# Altium PCB LiFi_Connected_no_dr.PcbDoc
Units mil, origin at the board's own origin, x right, y up, seen from the top; angles counter-clockwise.
Board outline 3149.61 x 2362.2 mil, 4 copper layers (Top Layer, L2_GND, L3_POWER, Bottom Layer), stack 63.08 mil thick; 66 components, 34 nets, 188 pads, 84 vias.
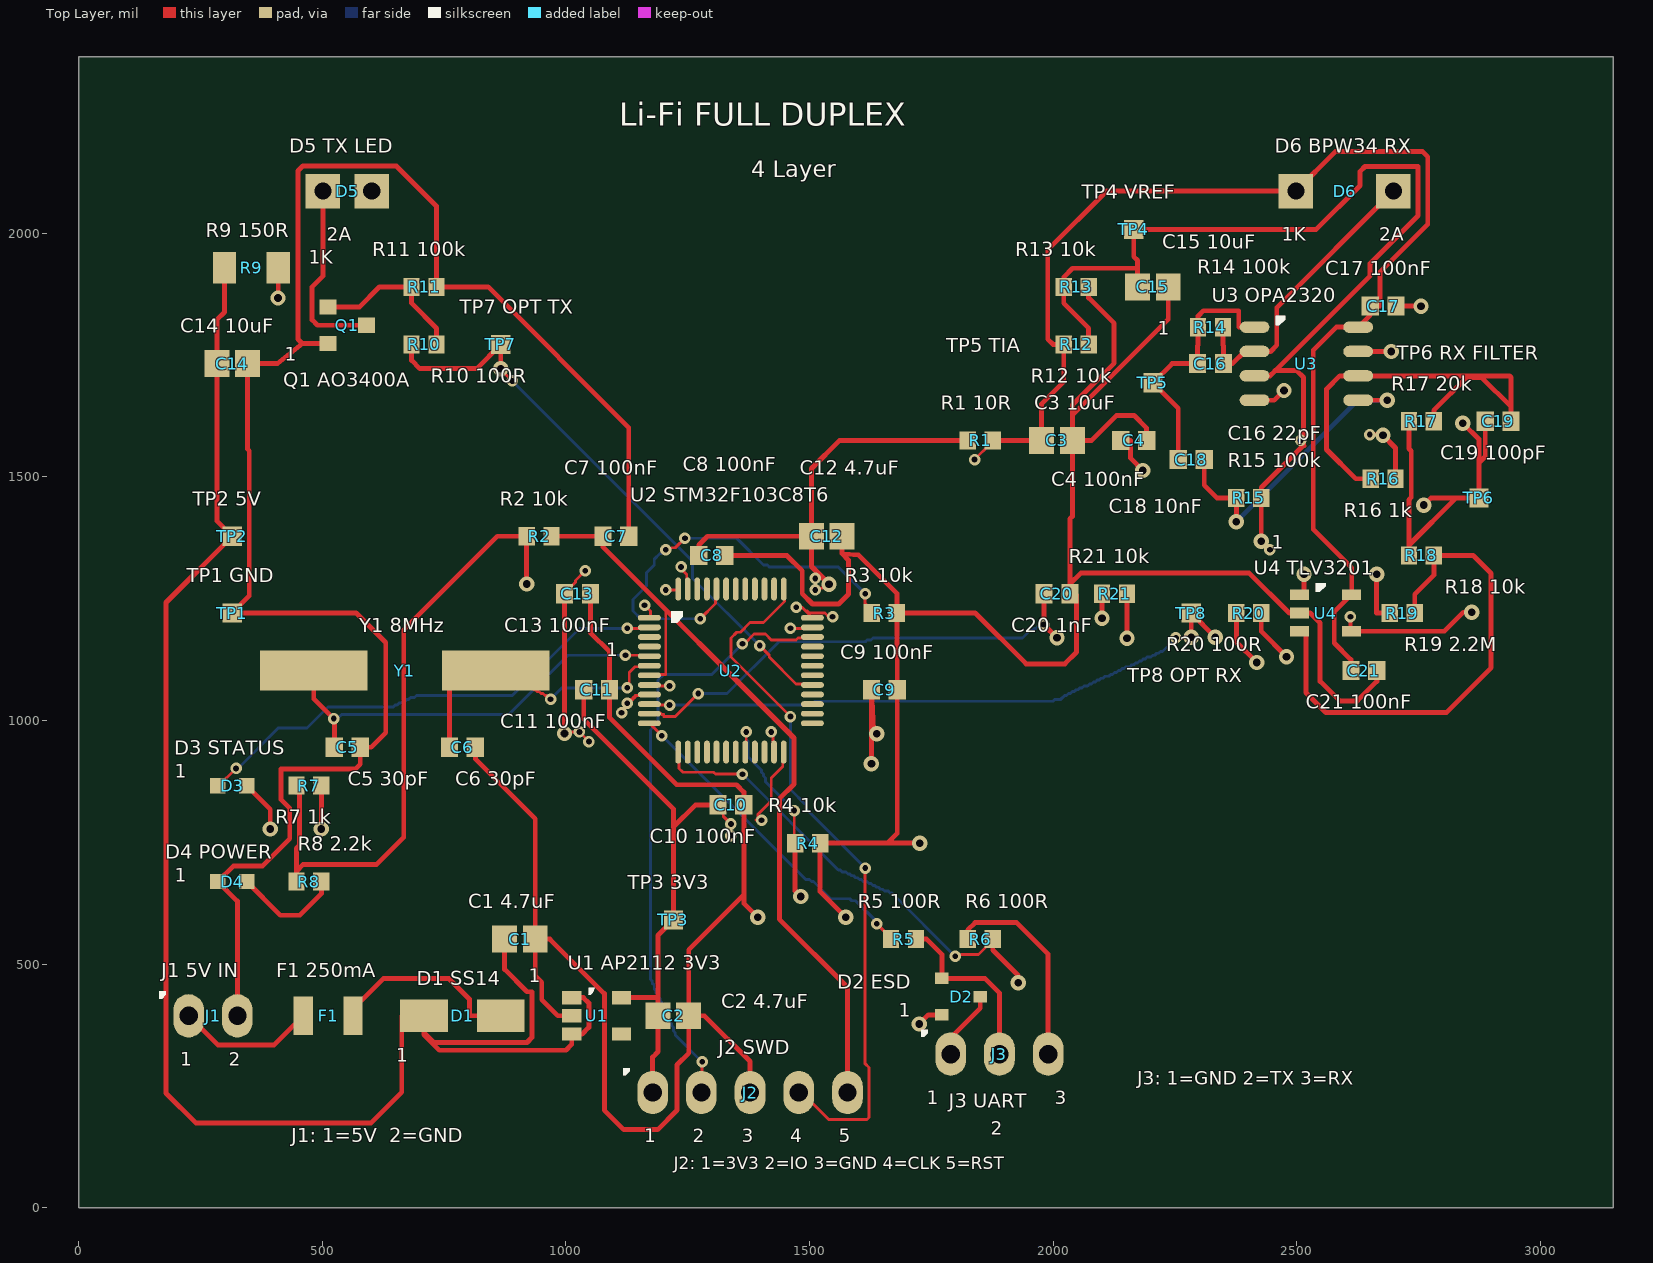
[diagram p0: Top Layer view]
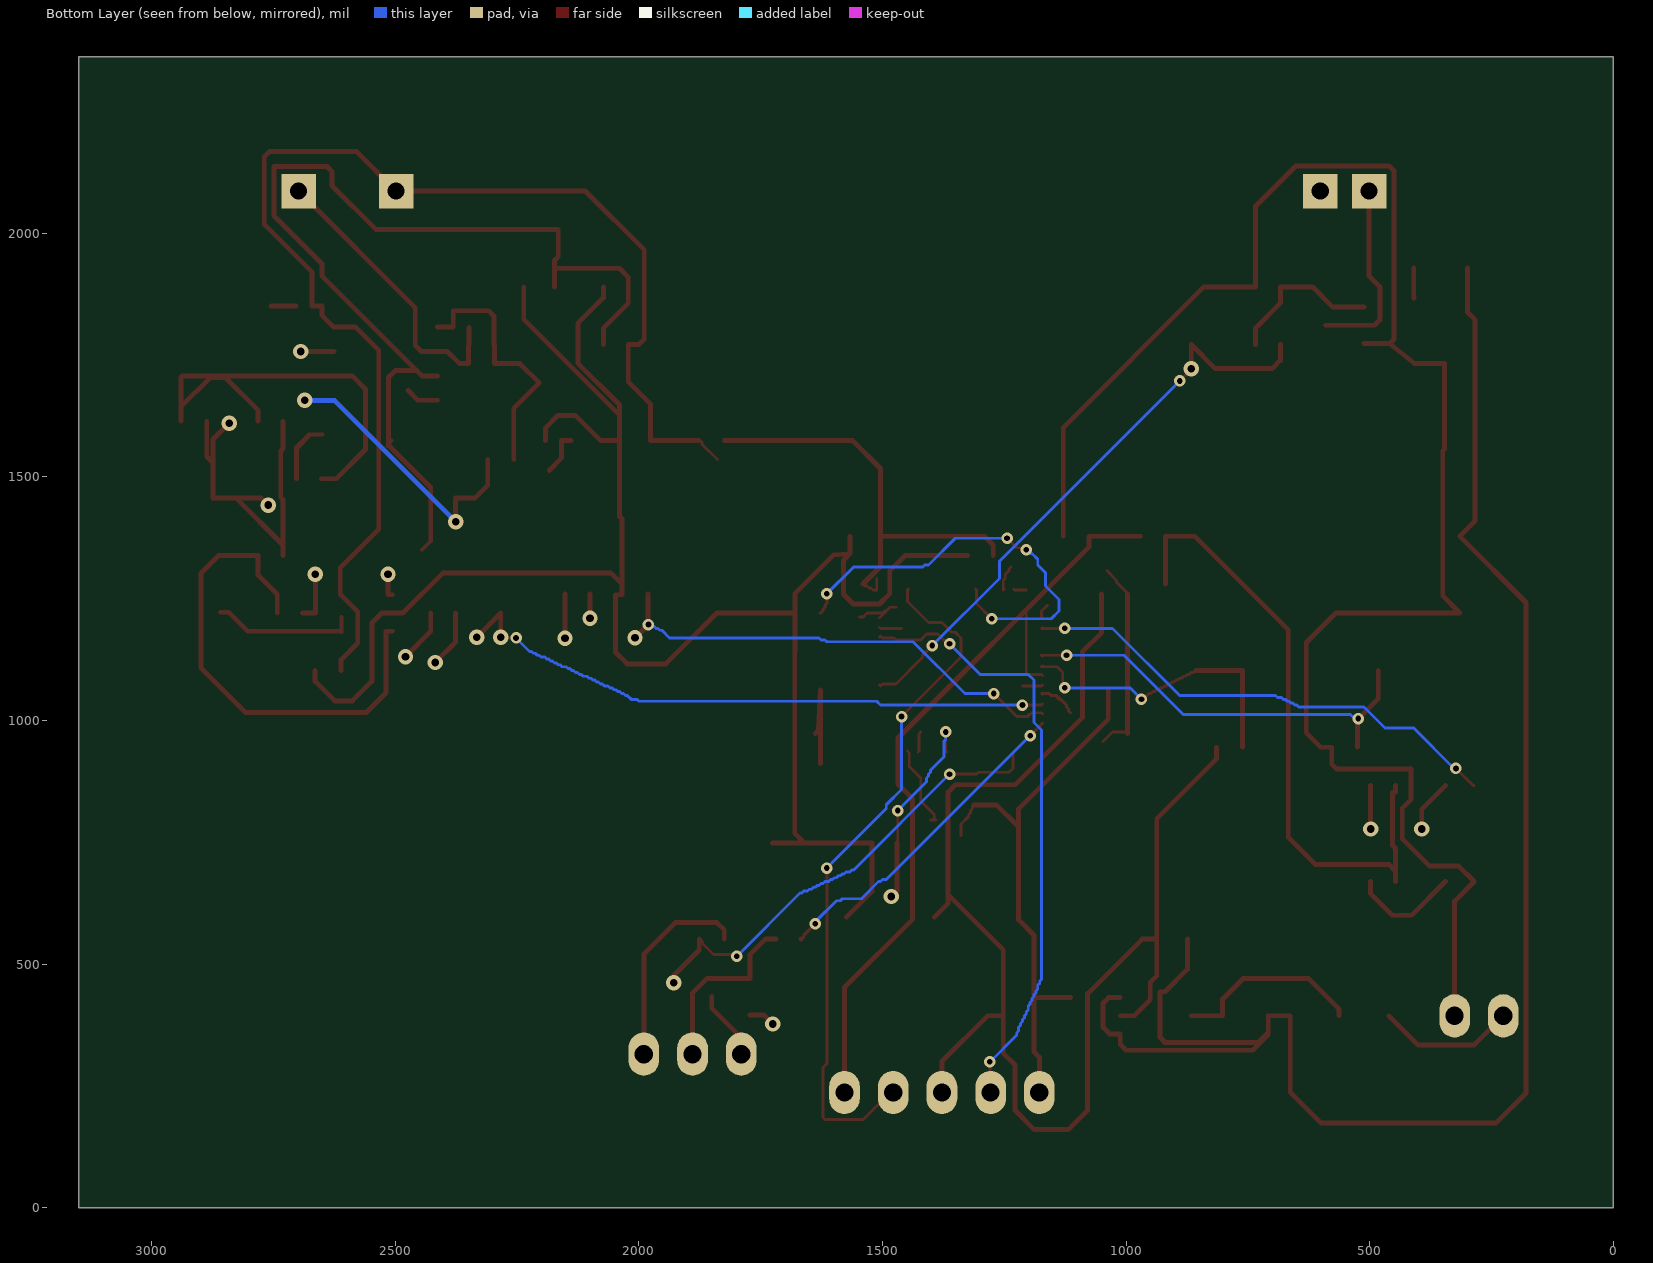
[diagram p1: Bottom Layer view, seen from below]
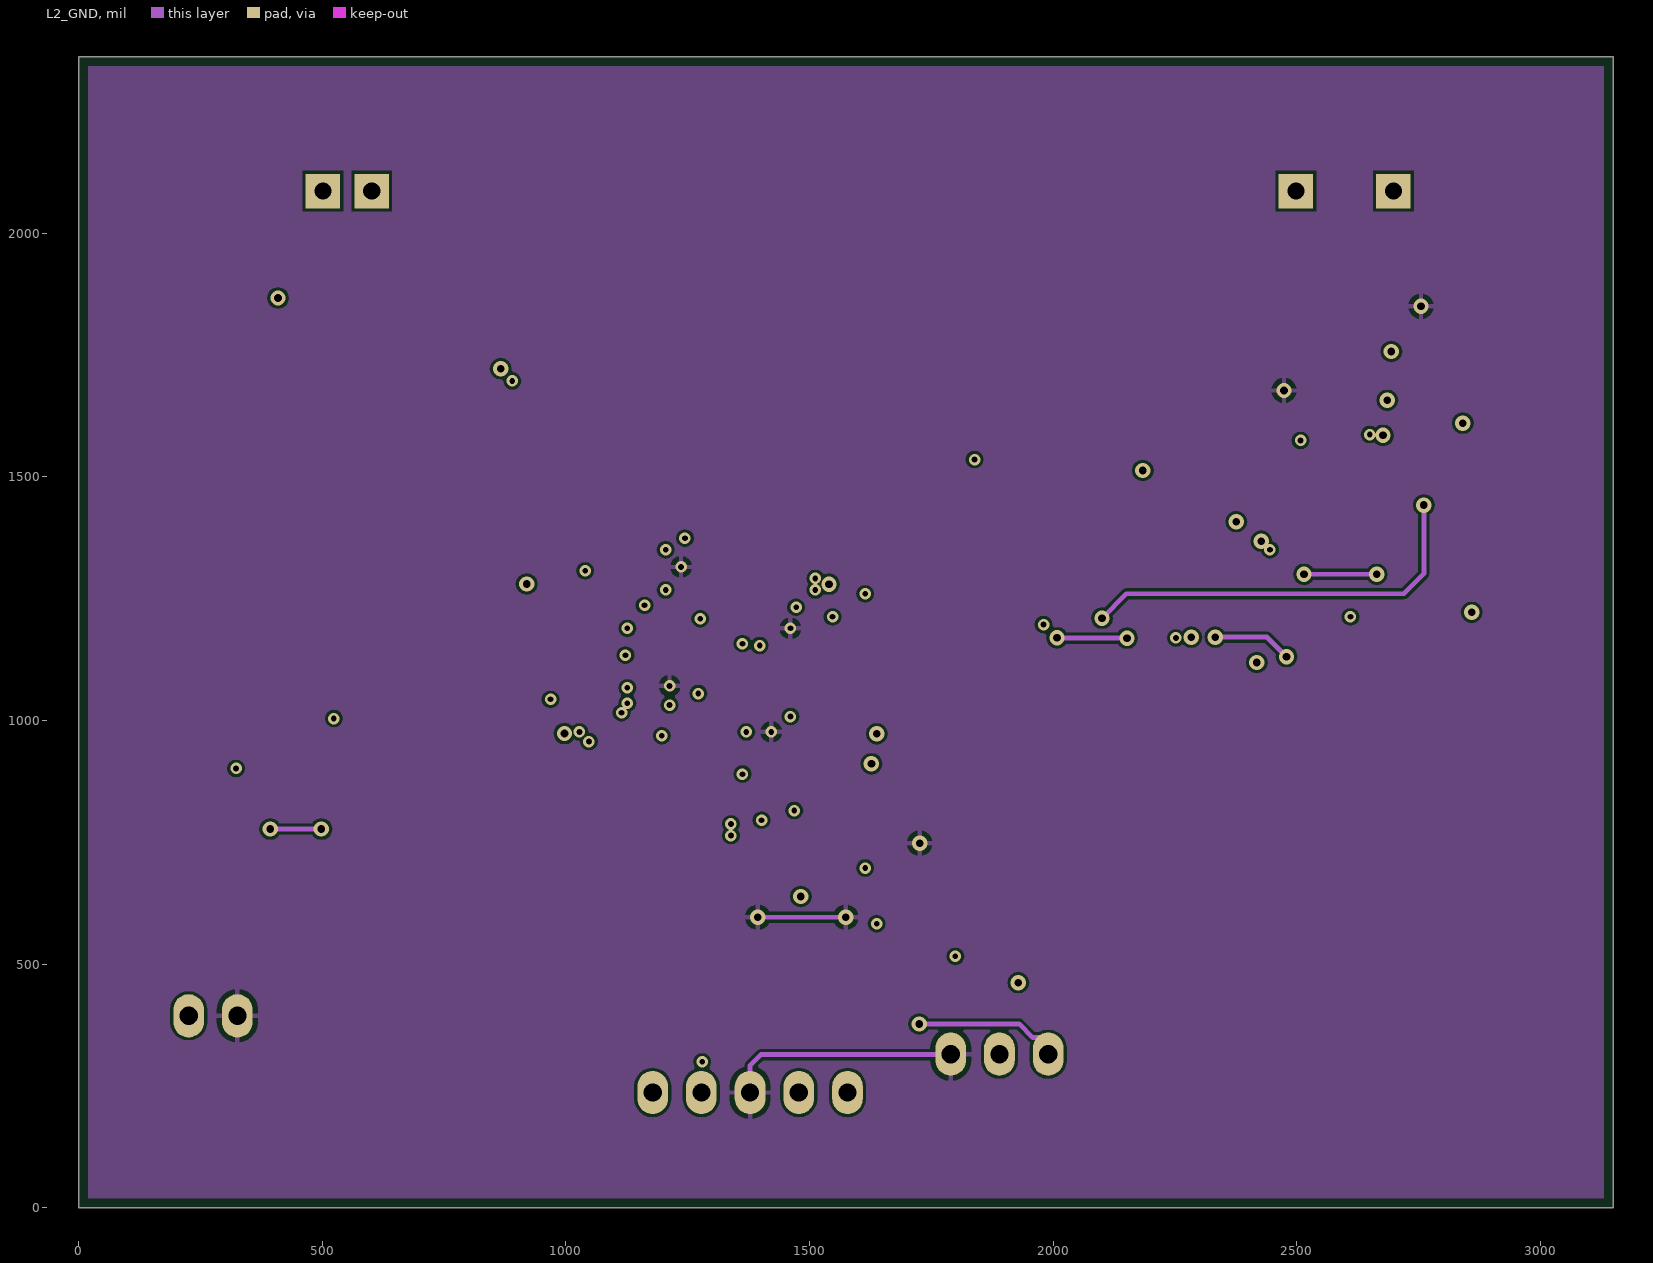
[diagram p2: L2_GND]
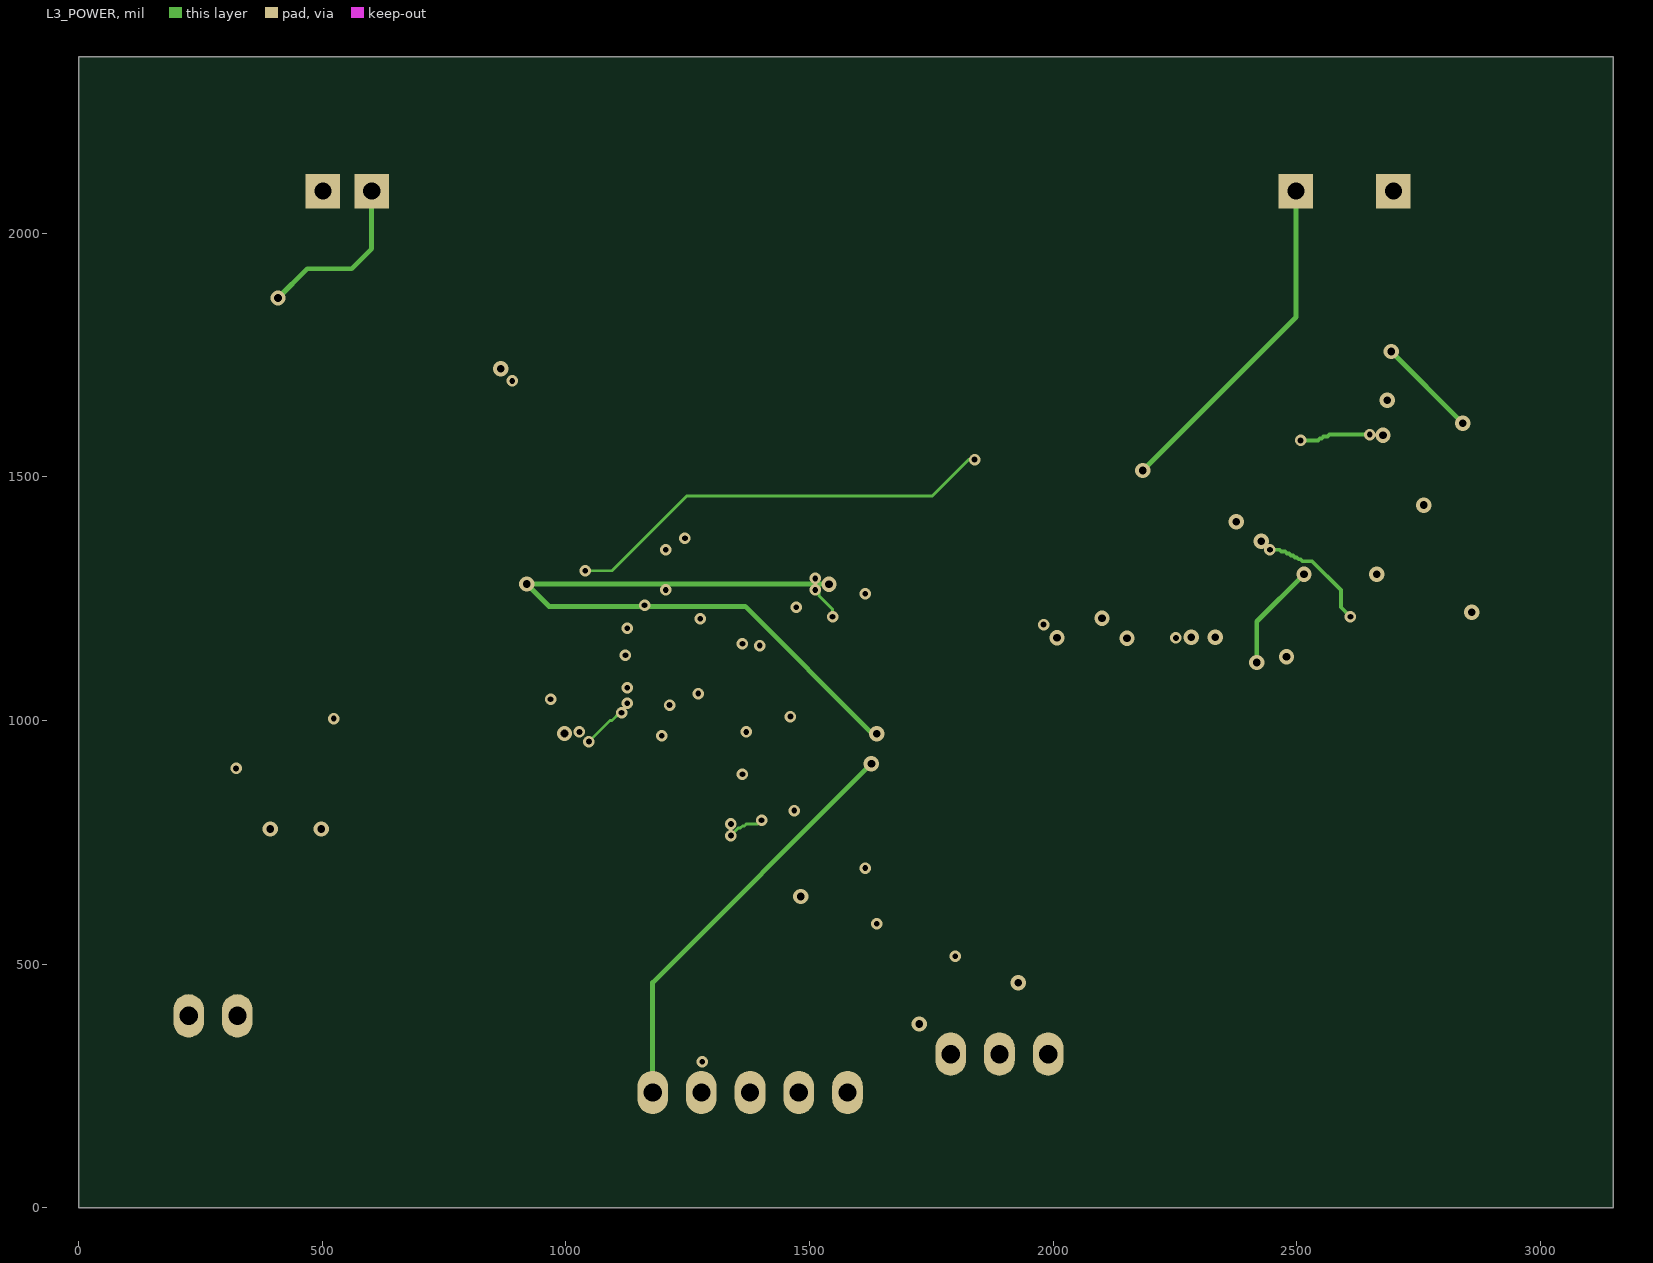
[diagram p3: L3_POWER]
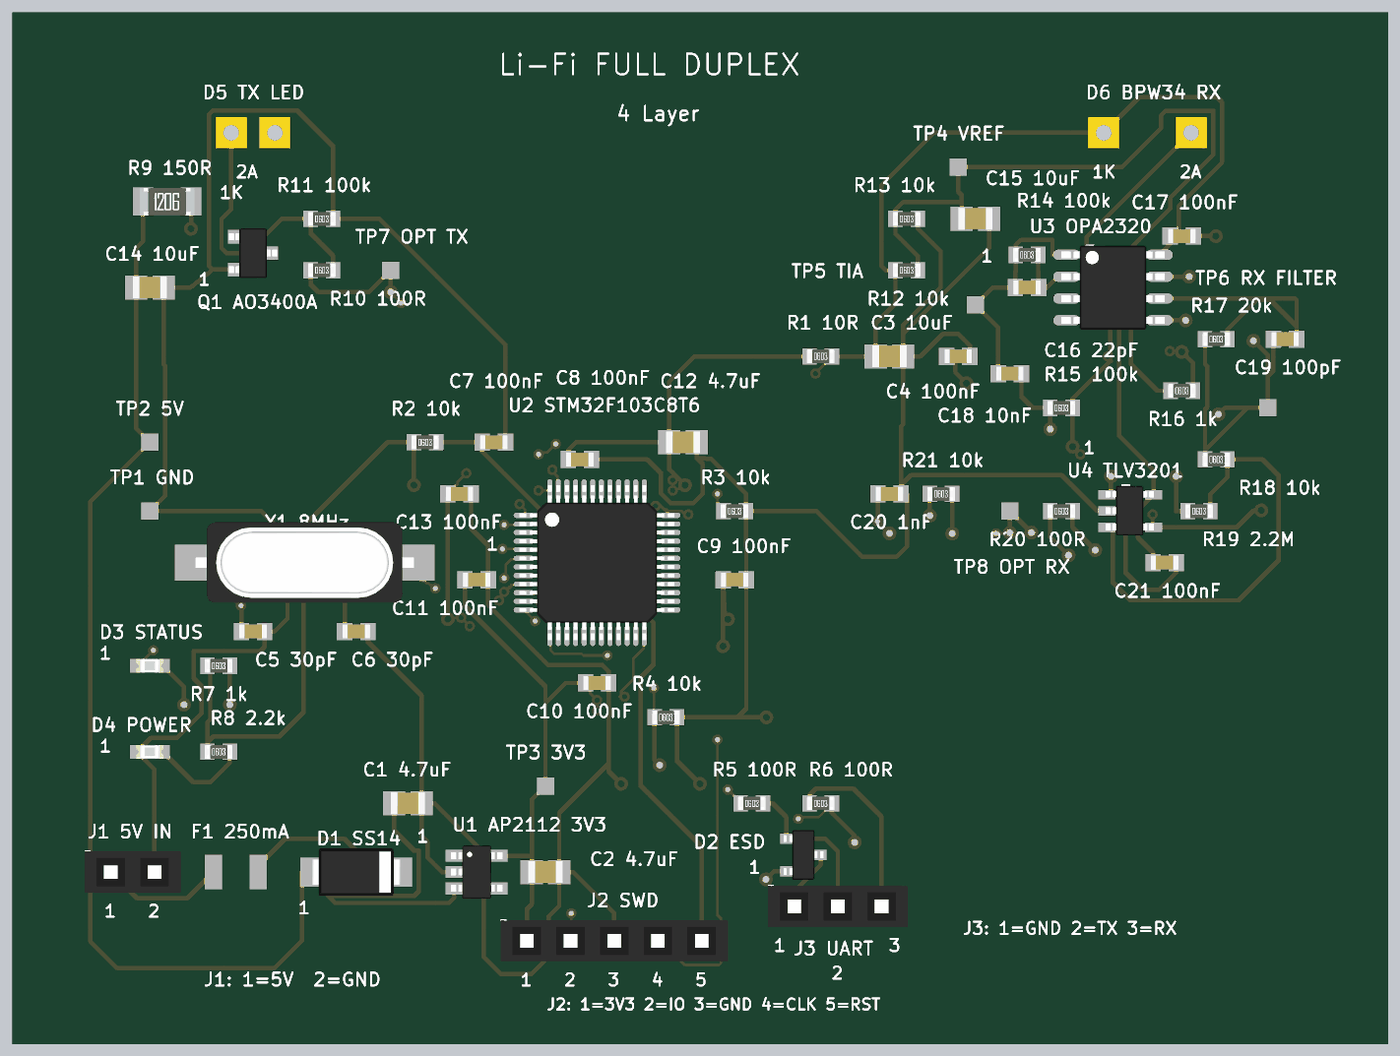
[diagram p4: 3D render of the assembled board from above, using the file's embedded part models]

## Layer stack, top to bottom
Top Solder: solder mask 0.4, Solder Resist, Dk 3.5
Top Layer: signal copper 1.4
Prepreg 1: dielectric 7.874, FR-4, Dk 4.8
L2_GND: signal copper 1.4
Core: dielectric 41.732, FR-4, Dk 4.8
L3_POWER: signal copper 1.4
Prepreg 2: dielectric 7.874, FR-4, Dk 4.8
Bottom Layer: signal copper 1.4
Bottom Solder: solder mask 0.4, Solder Resist, Dk 3.5

## Board outline
0,0 3149.61,0 3149.61,2362.2 0,2362.2

## Design rules (kind name [scope] priority, off if disabled: settings)
Clearance [All] p1: gap=5.91 ignorepadtopadclearanceinfootprint=FALSE
MinimumSolderMaskSliver [All] p1: minsoldermaskwidth=4
PolygonConnect [All] p1: connectstyle=Relief reliefconductorwidth=10 reliefentries=4 polygonreliefangle="90 Angle" airgapwidth=10
RoutingVias [All] p1: holewidth=28 width=50 viastyle="Through Hole" minholewidth=28 minwidth=50 maxholewidth=28 maxwidth=50
SolderMaskExpansion [All] p1: expansion=0.98 istentingtop=FALSE
SupplyNets "Schematic Supply Nets_4" [InNet('GND')] p1: voltage=0.000
SupplyNets "Schematic Supply Nets_3" [InNet('V3V3_A')] p2: voltage=0.000
SupplyNets "Schematic Supply Nets_2" [InNet('VREF')] p3: voltage=0.000
SupplyNets "Schematic Supply Nets_1" [InNet('V5_PROTECTED')] p4: voltage=0.000
SupplyNets "Schematic Supply Nets" [InNet('V3V3')] p5: voltage=0.000
Width [All] p1: maxlimit=78.74 minlimit=5.91 preferedwidth=10
29 further rules are at their usual default settings.

## Components (designator, comment, footprint, x,y, rotation, side; value= is the part's Value field where it differs from the comment)
C1 "4.7uF 10V X7R" "CAP 0805_2012" 905.51,551.18 r0 top
C2 "4.7uF 10V X7R" "CAP 0805_2012" 1220.47,393.7 r0 top
C3 "10uF 10V X7R" "CAP 0805_2012" 2007.87,1574.8 r0 top
C4 "100nF" "CAP 0603_1608" 2165.35,1574.8 r0 top
C5 "30pF C0G (tune)" "CAP 0603_1608" 551.18,944.88 r0 top
C6 "30pF C0G (tune)" "CAP 0603_1608" 787.4,944.88 r0 top
C7 "100nF" "CAP 0603_1608" 1102.36,1377.95 r0 top
C8 "100nF" "CAP 0603_1608" 1299.21,1338.58 r0 top
C9 "100nF" "CAP 0603_1608" 1653.54,1062.99 r0 top
C10 "100nF" "CAP 0603_1608" 1338.58,826.77 r0 top
C11 "100nF" "CAP 0603_1608" 1062.99,1062.99 r0 top
C12 "4.7uF" "CAP 0805_2012" 1535.43,1377.95 r0 top
C13 "100nF" "CAP 0603_1608" 1023.62,1259.84 r0 top
C14 "10uF 10V" "CAP 0805_2012" 314.96,1732.28 r0 top
C15 "10uF" "CAP 0805_2012" 2204.72,1889.76 r0 top
C16 "22pF C0G (tune)" "CAP 0603_1608" 2322.83,1732.28 r0 top
C17 "100nF" "CAP 0603_1608" 2677.17,1850.39 r0 top
C18 "10nF C0G" "CAP 0603_1608" 2283.46,1535.43 r0 top
C19 "100pF C0G" "CAP 0603_1608" 2913.39,1614.17 r0 top
C20 "1nF" "CAP 0603_1608" 2007.87,1259.84 r0 top
C21 "100nF" "CAP 0603_1608" 2637.8,1102.36 r0 top
D1 "SS14" "DO214AC SMA" 787.4,393.7 r0 top
D2 "PESD3V3S2BT" "NEXPERIA SOT-23-3" 1811.02,433.07 r0 top
D3 "GREEN status LED" "LED 0603_1608 GREEN" 314.96,866.14 r0 top
D4 "GREEN power LED" "LED 0603_1608 GREEN" 314.96,669.29 r0 top
D5 "WP7113SRD/D visible red" "KINGBRIGHT WP7113SRD" 551.18,2086.61 r0 top
D6 "BPW34 photodiode" "VISHAY BPW34" 2598.43,2086.61 r0 top
F1 "MF-NSMF025X-2 250mA" "BOURNS MF-NSMF025X" 511.81,393.7 r0 top
J1 "5V regulated input" "SAMTEC SSW-102-03-T-S" 275.59,393.7 r0 top
J2 "SWD 3.3V reference" "SAMTEC SSW-105-03-T-S" 1377.95,236.22 r0 top
J3 "UART 3.3V logic" "SAMTEC SSW-103-03-T-S" 1889.76,314.96 r0 top
Q1 "AO3400A" "DIODES SOT-23-3" 551.18,1811.02 r0 top
R1 "10R" "RES 0603_1608" 1850.39,1574.8 r0 top
R2 "10k" "RES 0603_1608" 944.88,1377.95 r0 top
R3 "10k" "RES 0603_1608" 1653.54,1220.47 r0 top
R4 "10k" "RES 0603_1608" 1496.06,748.03 r0 top
R5 "100R" "RES 0603_1608" 1692.91,551.18 r0 top
R6 "100R" "RES 0603_1608" 1850.39,551.18 r0 top
R7 "1k" "RES 0603_1608" 472.44,866.14 r0 top
R8 "2.2k" "RES 0603_1608" 472.44,669.29 r0 top
R9 "150R 0.25W" "RES 1206_3216" 354.33,1929.13 r0 top
R10 "100R" "RES 0603_1608" 708.66,1771.65 r0 top
R11 "100k" "RES 0603_1608" 708.66,1889.76 r0 top
R12 "10k 0.1%" "RES 0603_1608" 2047.24,1771.65 r0 top
R13 "10k 0.1%" "RES 0603_1608" 2047.24,1889.76 r0 top
R14 "100k 1%" "RES 0603_1608" 2322.83,1807.09 r0 top
R15 "100k" "RES 0603_1608" 2401.57,1456.69 r0 top
R16 "1k" "RES 0603_1608" 2677.17,1496.06 r0 top
R17 "20k" "RES 0603_1608" 2755.91,1614.17 r0 top
R18 "10k" "RES 0603_1608" 2755.91,1338.58 r0 top
R19 "2.2M" "RES 0603_1608" 2716.54,1220.47 r0 top
R20 "100R" "RES 0603_1608" 2401.57,1220.47 r0 top
R21 "10k" "RES 0603_1608" 2125.98,1259.84 r0 top
TP1 "GND" "TEST PAD 1MM" 314.96,1220.47 r0 top
TP2 "V5_PROTECTED" "TEST PAD 1MM" 314.96,1377.95 r0 top
TP3 "V3V3" "TEST PAD 1MM" 1220.47,590.55 r0 top
TP4 "VREF" "TEST PAD 1MM" 2165.35,2007.87 r0 top
TP5 "TIA_OUT" "TEST PAD 1MM" 2204.72,1692.91 r0 top
TP6 "RX_FILTER" "TEST PAD 1MM" 2874.02,1456.69 r0 top
TP7 "OPT_TX" "TEST PAD 1MM" 866.14,1771.65 r0 top
TP8 "OPT_RX" "TEST PAD 1MM" 2283.46,1220.47 r0 top
U1 "AP2112K-3.3TRG1" "DIODES SOT-23-5 K" 1062.99,393.7 r0 top
U2 "STM32F103C8T6" "ST LQFP-48 7x7MM" 1338.58,1102.36 r0 top
U3 "OPA2320AID" "TI SOIC-8 D" 2519.68,1732.28 r0 top
U4 "TLV3201AIDBVR" "TI SOT-23-5 DBV" 2559.06,1220.47 r0 top
Y1 "ABLS-8.000MHZ-B2-T" "ABRACON ABLS" 669.29,1102.36 r0 top

## Footprints (in the part's own frame and the unit in brackets; to place one, negate y for a bottom-side part, rotate by r counter-clockwise, add the part's x,y. Pads: shape width x height; smd on the part's side, far side on the other; paste and mask are expansions set on the pad)
"ABRACON ABLS" [mm] "Crystal, 2-Leads, Body 4.70x11.40mm, Pitch 8.80mm, IPC Medium Density"
  rect 5.6x2.1 smd: 1(-4.75,0) 2(4.75,0)
  body extent -6.35,-2.35 6.35,2.35, height 4.2
"BOURNS MF-NSMF025X" [mm]
  rect 1x2 smd: 1(-1.3,0) 2(1.3,0)
"CAP 0603_1608" [mm] "Chip Capacitor, 2-Leads, Body 1.60x0.80mm, IPC Medium Density"
  rect 0.9x1 smd: 1(-0.675,0) 2(0.675,0)
  body extent -0.8,-0.41 0.8,0.41, height 0.82
"CAP 0805_2012" [mm] "Chip Capacitor, 2-Leads, Body 2.00x1.20mm, IPC Medium Density"
  rect 1.3x1.4 smd: 1(-0.8,0) 2(0.8,0)
  body extent -1,-0.64 1,0.64, height 1.26
"DIODES SOT-23-3" [mm] "SOT23, 3-Leads, Body 2.90x2.40mm, Pitch 0.95mm, IPC Medium Density"
  rect 0.9x0.8 smd: 1(-1,0.95) 2(-1,-0.95) 3(1,0)
  body extent -1.41,-1.45 1.41,1.45, height 1.5
"DIODES SOT-23-5 K" [mm] "SOT23, 5-Leads, Body 3.00x2.85mm, Pitch 0.95mm, IPC Medium Density"
  rect 1x0.7 smd: 1(-1.3,0.95) 2(-1.3,0) 3(-1.3,-0.95) 4(1.3,-0.95) 5(1.3,0.95)
  silkscreen extent -0.45,1.1 -0.1,1.45, body extent -1.5,-1.55 1.5,1.55, height 1.45
"DO214AC SMA" [mm] "Molded Diode, 2-Leads, Body 4.30x2.60mm, IPC Medium Density"
  rect 2.5x1.7 smd: 1(-2,0) 2(2,0)
  body extent -2.6,-1.37 2.6,1.37, height 2.4
"KINGBRIGHT WP7113SRD" [mm]
  rect 1.8x1.8 hole 0.9: 1(-1.27,0) 2(1.27,0)
"LED 0603_1608 GREEN" [mm] "Chip Diode, 2-Leads, Body 1.60x0.80mm, IPC Medium Density"
  rect 0.8x0.8 smd: 1(-0.75,0) 2(0.75,0)
  body extent -0.8,-0.4 0.8,0.4, height 0.53
"NEXPERIA SOT-23-3" [mm] "SOT23, 3-Leads, Body 2.90x2.40mm, Pitch 0.95mm, IPC Medium Density"
  rect 0.7x0.6 smd: 1(-1,0.95) 2(-1,-0.95) 3(1,0)
  body extent -1.16,-1.45 1.16,1.45, height 1.5
"RES 0603_1608" [mm] "Chip Resistor, 2-Leads, Body 1.60x0.80mm, IPC Medium Density"
  rect 0.85x0.95 smd: 1(-0.65,0) 2(0.65,0)
  body extent -0.8,-0.4 0.8,0.4, height 0.45
"RES 1206_3216" [mm] "Chip Resistor, 2-Leads, Body 3.13x1.55mm, IPC Medium Density"
  rect 1.2x1.65 smd: 1(-1.4,0) 2(1.4,0)
  body extent -1.6,-0.8 1.6,0.8, height 0.6
"SAMTEC SSW-102-03-T-S" [mm]
  oval 1.6x2.25 hole 0.95: 1(-1.27,0) 2(1.27,0)
  silkscreen extent -2.8,0.9 -2.46,1.27, body extent -2.79,-1.21 2.79,1.21, height 8.51
"SAMTEC SSW-103-03-T-S" [mm]
  oval 1.6x2.25 hole 0.95: 1(-2.54,0) 2(0,0) 3(2.54,0)
  silkscreen extent -4.07,0.9 -3.73,1.27, body extent -4.06,-1.21 4.06,1.21, height 8.51
"SAMTEC SSW-105-03-T-S" [mm]
  oval 1.6x2.25 hole 0.95: 1(-5.08,0) 2(-2.54,0) 3(0,0) 4(2.54,0) 5(5.08,0)
  silkscreen extent -6.61,0.9 -6.27,1.27, body extent -6.6,-1.21 6.6,1.21, height 8.51
"ST LQFP-48 7x7MM" [mm] "LQFP, 48-Leads, Body 7.00x7.00mm, Pitch 0.50mm, IPC Medium Density"
  oval 1.2x0.3 smd: 1(-4.25,2.75) 2(-4.25,2.25) 3(-4.25,1.75) 4(-4.25,1.25) 5(-4.25,0.75) 6(-4.25,0.25) 7(-4.25,-0.25) 8(-4.25,-0.75) 9(-4.25,-1.25) 10(-4.25,-1.75) 11(-4.25,-2.25) 12(-4.25,-2.75) 25(4.25,-2.75) 26(4.25,-2.25) 27(4.25,-1.75) 28(4.25,-1.25) 29(4.25,-0.75) 30(4.25,-0.25) 31(4.25,0.25) 32(4.25,0.75) 33(4.25,1.25) 34(4.25,1.75) 35(4.25,2.25) 36(4.25,2.75)
  oval 0.3x1.2 smd: 13(-2.75,-4.25) 14(-2.25,-4.25) 15(-1.75,-4.25) 16(-1.25,-4.25) 17(-0.75,-4.25) 18(-0.25,-4.25) 19(0.25,-4.25) 20(0.75,-4.25) 21(1.25,-4.25) 22(1.75,-4.25) 23(2.25,-4.25) 24(2.75,-4.25) 37(2.75,4.25) 38(2.25,4.25) 39(1.75,4.25) 40(1.25,4.25) 41(0.75,4.25) 42(0.25,4.25) 43(-0.25,4.25) 44(-0.75,4.25) 45(-1.25,4.25) 46(-1.75,4.25) 47(-2.25,4.25) 48(-2.75,4.25)
  silkscreen extent -3.1,2.5 -2.5,3.1, body extent -4.51,-4.51 4.51,4.51, height 1.55
"TEST PAD 1MM" [mm]
  rect 1x1 smd: 1(0,0)
"TI SOIC-8 D" [mm] "SOP, 8-Leads, Body 4.90x3.90mm, Pitch 1.27mm, IPC Medium Density"
  oval 1.55x0.6 smd: 1(-2.7,1.905) 2(-2.7,0.635) 3(-2.7,-0.635) 4(-2.7,-1.905) 5(2.7,-1.905) 6(2.7,-0.635) 7(2.7,0.635) 8(2.7,1.905)
  silkscreen extent -1.6,2 -1.1,2.5, body extent -3.01,-2.45 3.01,2.45, height 1.5
"TI SOT-23-5 DBV" [mm] "SOT23, 5-Leads, Body 2.90x2.80mm, Pitch 0.95mm, IPC Medium Density"
  rect 1x0.55 smd: 1(-1.35,0.95) 2(-1.35,0) 3(-1.35,-0.95) 4(1.35,-0.95) 5(1.35,0.95)
  silkscreen extent -0.5,1.1 0,1.55, body extent -1.44,-1.42 1.39,1.48, height 1.5
"VISHAY BPW34" [mm]
  rect 1.8x1.8 hole 0.9: 1(-2.54,0) 2(2.54,0)

## Part data
C1 C2 C3 C4 C5 C6 C7 C8 C9 C10 C11 C12 C13 C14 C15 C16 C17 C18 C19 C20 C21: library part Capacitor, "SMT Capacitor", LibrarySource="Celestial Altium Library; see Libraries/Celestial/ATTRIBUTION.md"
D1: library part Diode, "Rectifier Diode", LibrarySource="Celestial Altium Library; see Libraries/Celestial/ATTRIBUTION.md"
D2: library part "ON SEMI SOT-23-3", "TVS DIODE", Manufacturer=Nexperia, LibrarySource="Celestial ON SEMI template; pins adapted to Nexperia PESD3V3S2BT datasheet", Manufacturer Part Number=PESD3V3S2BT
D3 D4: library part LED, "Chip LED", LibrarySource="Celestial Altium Library; see Libraries/Celestial/ATTRIBUTION.md"
D5: library part LED, "Chip LED", Manufacturer=Kingbright, Manufacturer Part Number=WP7113SRD/D, LibrarySource="Celestial Altium Library; see Libraries/Celestial/ATTRIBUTION.md"
D6: library part PHOTODIODE, "Photodiode", Manufacturer=Vishay, Manufacturer Part Number=BPW34, LibrarySource="Celestial Altium Library; see Libraries/Celestial/ATTRIBUTION.md"
F1: library part "MOUNTED FUSE", "GENERIC_fuse", Manufacturer=Bourns, Manufacturer Part Number=MF-NSMF025X-2, LibrarySource="Celestial Altium Library; see Libraries/Celestial/ATTRIBUTION.md"
J1: library part "2 Pin", Manufacturer=Samtec, Manufacturer Part Number=SSW-102-03-T-S, LibrarySource="Celestial Altium Library; see Libraries/Celestial/ATTRIBUTION.md"
J2: library part "5 Pin", Manufacturer=Samtec, Manufacturer Part Number=SSW-105-03-T-S, LibrarySource="Celestial Altium Library; see Libraries/Celestial/ATTRIBUTION.md"
J3: library part "3 Pin", Manufacturer=Samtec, Manufacturer Part Number=SSW-103-03-T-S, LibrarySource="Celestial Altium Library; see Libraries/Celestial/ATTRIBUTION.md"
Q1: library part "DIODES INC MOSFET N-CH SOT-23-3", Manufacturer="Alpha & Omega Semiconductor", LibrarySource="Celestial Altium Library; see Libraries/Celestial/ATTRIBUTION.md", Manufacturer Part Number=AO3400A
R1 R2 R3 R4 R5 R6 R7 R8 R9 R10 R11 R12 R13 R14 R15 R16 R17 R18 R19 R20 R21: library part Resistor, "SMT Resistor", LibrarySource="Celestial Altium Library; see Libraries/Celestial/ATTRIBUTION.md"
TP1 TP2 TP3 TP4 TP5 TP6 TP7 TP8: library part "Test Point", LibrarySource="Celestial Altium Library; see Libraries/Celestial/ATTRIBUTION.md"
U1: library part "DIODES INC AP2112K", Manufacturer="Diodes Incorporated", LibrarySource="Celestial Altium Library; see Libraries/Celestial/ATTRIBUTION.md", Manufacturer Part Number=AP2112K-3.3TRG1
U2: library part "ST MICROELECTRONICS STM32F103C(8-B)TX LQFP48", Manufacturer=STMicroelectronics, LibrarySource="Celestial Altium Library; see Libraries/Celestial/ATTRIBUTION.md", Manufacturer Part Number=STM32F103C8T6
U3: library part "TI OPA2320", Manufacturer="Texas Instruments", LibrarySource="Celestial Altium Library; see Libraries/Celestial/ATTRIBUTION.md", Manufacturer Part Number=OPA2320AID
U4: library part "MICROCHIP MCP6541 5 PIN", Manufacturer="Texas Instruments", LibrarySource="Celestial Altium Library; see Libraries/Celestial/ATTRIBUTION.md", Manufacturer Part Number=TLV3201AIDBVR
Y1: library part "Abracon Crystal ABLS", "SMT Crystal", Manufacturer=Abracon, LibrarySource="Celestial Altium Library; see Libraries/Celestial/ATTRIBUTION.md", Manufacturer Part Number=ABLS-8.000MHZ-B2-T

## Via types
v1: diameter 23.62, hole 11.81, Top Layer to Bottom Layer, 26 vias
v2: diameter 31.5, hole 15.75, Top Layer to Bottom Layer, 20 vias
v3: diameter 23.62, hole 11.81, Top Layer to L3_POWER, 19 vias
v4: diameter 31.5, hole 15.75, Top Layer to L3_POWER, 10 vias
v5: diameter 31.5, hole 15.75, Top Layer to L2_GND, 5 vias
v6: diameter 23.62, hole 11.81, Top Layer to L2_GND, 4 vias

## Nets (pads, with @x,y where several pads share a name; then routed paths per layer and width w, separated by ;. In a path a pad name is that pad's centre, name@x,y a point inside that pad or via, vN(x,y) a via of type N, cw(c..) or ccw(c..) an arc to the next point about the centre after c; other vN are vias at no path point)
BOOT0: R3.1 U2.44 | length 888
  Top Layer w5.91: v1(1204.72,1350.39) 1212.6,1350.39 1216.54,1354.33 1224.41,1354.33 v1(1244.09,1374.02) ; v1(1275.59,1208.66) 1307.09,1240.16 1307.09,1267.72 U2.44 ; v1(1614.17,1259.84) 1614.17,1240.16 1618.11,1236.22 1618.11,1232.28 1622.05,1228.35 1622.05,1224.41 1625.98,1220.47 R3.1
  Bottom Layer w5.91: v1(1204.72,1350.39) 1196.85,1342.52 1192.91,1342.52 1181.1,1330.71 1181.1,1318.9 1165.35,1303.15 1165.35,1275.59 1137.8,1248.03 1137.8,1224.41 1153.54,1208.66 v1(1275.59,1208.66) ; v1(1244.09,1374.02) 1350.39,1374.02 1405.51,1318.9 1413.39,1318.9 1417.32,1314.96 1559.06,1314.96 v1(1614.17,1259.84)
BOOT1: R4.1 U2.20 | length 427.4
  Top Layer w5.91: U2.20 1370.08,937.01 v1(1370.08,976.38) ; v1(1468.5,814.96) 1468.5,748.03 R4.1
  Top Layer w10: R4.1 1470.47,650.15 v2(1482,638.62)
  Bottom Layer w5.91: v1(1370.08,976.38) 1370.08,960.63 1374.02,956.69 1374.02,925.2 1401.57,897.64 1401.57,893.7 1405.51,889.76 1405.51,885.83 1409.45,881.89 1409.45,874.02 v1(1468.5,814.96)
CMP_OUT: R19.1 R20.1 U4.1 | length 646.7
  Top Layer w10: R20.1 2375.98,1161.02 v2(2418,1119) ; U4.1 2515,1257.87 v2(2515,1300) ; v2(2664,1300) 2664,1220.47 R19.1
  L2_GND w10: v2(2515,1300) v2(2664,1300)
  L3_POWER w10: v2(2418,1119) 2418,1203 v2(2515,1300)
CMP_PLUS: R18.2 R19.2 U4.3 | length 1035.1
  Top Layer w10: U4.3 2519,1183.07 2519,1057 2560,1016 2807,1016 2899,1108 2899,1301.58 2862,1338.58 R18.2 2781.5,1298.37 2742.13,1259 R19.2
FUSED_5V: D1.2 F1.2 | length 394.8
  Top Layer w10: F1.2 562.99,408 624.99,470 760,470 802,428 802,393.7 D1.2
GAIN_FB: C19.2 R16.1 R17.2 U3.6 | length 954.3
  Top Layer w10: R16.1 2621,1496.06 2561,1556.06 2561,1680 2588.28,1707.28 U3.6 2936.68,1707.28 2939.96,1704 2939.96,1643.63 ; R17.2 2781.5,1636.6 2848.49,1703.59 2880,1703.59 2939.96,1643.63 ; C19.2 2939.96,1643.63
GND: C1.2 C2.2 C3.2 C4.2 C5.2 C6.2 C7.2 C8.2 C9.2 C10.2 C11.2 C12.2 C13.2 C14.2 C15.2 C17.2 C20.2 C21.2 D2.3 D4.1 J1.2 J2.3 J3.1 Q1.2 R3.2 R4.2 R11.2 R13.2 TP1.1 U1.2 U2.8 U2.23 U2.35 U2.47 U3.4 U4.2 | length 11841.9
  Top Layer w5.91: U2.8 1173.23,1070.87 v6(1212.6,1070.87) ; v6(1236.22,1314.96) 1240.16,1311.02 1240.16,1307.09 1248.03,1299.21 1248.03,1291.34 1251.97,1287.4 1251.97,1267.72 U2.47 ; v6(1421.26,976.38) 1425.2,972.44 1425.2,937.01 U2.23 ; v6(1460.63,1188.98) 1503.94,1188.98 U2.35
  Top Layer w10: J1.2 325.59,629.14 D4.1 317.14,701 377,701 433,757 433,820 415,838 415,900 567.76,900 577.76,910 C5.2 600,944.88 630,974.88 630,1160 569.53,1220.47 TP1.1 350,1255.51 350,1553 346.46,1556.54 C14.2 408,1732.28 459,1773.62 ; Q1.2 459,1773.62 ; C6.2 813.98,920.98 937.01,797.95 C1.2 ; U1.2 983.31,393.7 950.36,426.65 950.36,462.17 937.01,475.51 C1.2 ; C13.2 1050.2,1180.37 1089.57,1141 C11.2 1089.57,1005.43 1227,868 1350,868 1365.16,852.84 C10.2 1365.16,642.16 ; C7.2 1128.94,1601.06 840.24,1889.76 R11.2 734.25,2055.75 652,2138 460,2138 450,2128 450,1782.62 459,1773.62 ; C8.2 1453.42,1338.58 1485,1307 1485,1260 1506,1239 1560,1239 1580,1259 1580,1329 1566.93,1342.07 ; J2.3 1377.95,300 1284.25,393.7 C2.2 ; v5(1393.73,596) 1365.16,624.57 1365.16,642.16 ; C12.2 1566.93,1342.07 ; v5(1574,596) 1521.65,648.35 R4.2 1660.03,748.03 ; v5(1726.03,748.03) 1660.03,748.03 ; J3.1 1789.76,349 1850.39,409.63 D2.3 ; R13.2 2072.83,1867.34 2125.24,1814.93 2125.24,1733.24 2039.37,1647.37 2039.37,1626.37 ; C4.2 2191.93,1600 2165.93,1626 2130.2,1626 2079,1574.8 C3.2 ; C15.2 2236.22,1823.22 2039.37,1626.37 ; U3.4 2453.9,1657.28 v5(2473.9,1677.28) ; C21.2 2664.37,1080 2624.37,1040 2588,1040 2548,1080 2548,1200 2527.53,1220.47 U4.2 2484.53,1220.47 2402.55,1302.45 2056.9,1302.45 2034.45,1280 ; C17.2 2754.61,1850.39 v5(2755,1850) ; C1.2 967,551.18 1079,439.18 1079,200 1119,160 1188,160 1228,200 1228,293 1251.97,316.97 C2.2 ; C2.2 1251.97,528.97 1365.16,642.16 ; 1566.93,1342.07 1600.32,1339.68 1679.13,1260.87 R3.2 ; 1660.03,748.03 1680.12,768.12 C9.2 1680.12,1141 1679.13,1141.98 R3.2 ; R3.2 1840,1220.47 1944.47,1116 2024,1116 2048,1140 2048,1258 2034.45,1258 C20.2 2034.45,1280 ; 2034.45,1280 2034.45,1414 2039.37,1418.92 C3.2 ; C3.2 2039.37,1626.37
  L2_GND w10: J2.3 1377.95,291.95 1400,314 1789.76,314 J3.1 ; v5(1393.73,596) v5(1574,596)
HOST_RX: R6.2 U2.13 | length 968.7
  Top Layer w5.91: U2.13@1228.35,937.01 1232.28,933.07 1232.28,901.57 1240.16,893.7 1303.15,893.7 1307.09,889.76 v1(1362.2,889.76) ; v1(1799.21,515.75) 1807.09,515.75 1811.02,519.68 1846.46,519.68 1870.08,543.31 1870.08,547.24 1874.02,551.18 R6.2
  Top Layer w10: R6.2 1875.98,528.76 1928.39,476.35 v2(1928.39,461.77)
  Bottom Layer w5.91: v1(1362.2,889.76) 1559.06,692.91 1562.99,692.91 1566.93,688.98 1574.8,688.98 1578.74,685.04 1582.68,685.04 1586.61,681.1 1590.55,681.1 1594.49,677.17 1598.43,677.17 1602.36,673.23 1606.3,673.23 1610.24,669.29 1618.11,669.29 1622.05,665.35 1625.98,665.35 1629.92,661.42 1633.86,661.42 1637.8,657.48 1641.73,657.48 1645.67,653.54 1649.61,653.54 1653.54,649.61 1661.42,649.61 1665.35,645.67 1669.29,645.67 v1(1799.21,515.75)
HOST_TX: R5.1 U2.12 | length 684.1
  Top Layer w5.91: U2.12 v1(1196.85,968.5) ; v1(1637.8,582.68) 1661.42,559.06 1661.42,555.12 1665.35,551.18 R5.1
  Bottom Layer w5.91: v1(1196.85,968.5) 1492.13,673.23 1500,673.23 1503.94,669.29 1507.87,669.29 1543.31,633.86 1582.68,633.86 1586.61,629.92 1594.49,629.92 1637.8,586.61 v1(1637.8,582.68)
LED_A: D5.2 R9.2 | length 414.8
  Top Layer w10: v4(409,1867) 409.45,1867.45 R9.2
  L3_POWER w10: v4(409,1867) 469,1927 560,1927 601.18,1968.18 D5.2
LED_K: D5.1 Q1.3 | length 389.9
  Top Layer w10: D5.1 501.18,1912 479,1889.82 479,1822.02 490,1811.02 Q1.3
NRST: C7.1 J2.5 R2.2 U2.7 | length 1830
  Top Layer w5.91: 1075.79,1356.21 1074.8,1354.33 1204.72,1224.41 1204.72,1094.49 1173.23,1094.49 U2.7
  Top Layer w10: R2.2 C7.1 1075.79,1356.21 1468,964 1468,869 1438,839 1438,592 1577.95,452.05 J2.5
OPT_RX: R20.2 TP8.1 U2.10 | length 1564.8
  Top Layer w5.91: U2.10 1173.23,1031.5 v1(1212.6,1031.5) ; v1(2251.97,1169.29) 2283.46,1169.29 v2(2283.46,1170.79)
  Top Layer w10: v2(2283.46,1170.79) TP8.1 v2(2332.94,1171) ; R20.2 2427.17,1182.83 v2(2479,1131)
  L2_GND w10: v2(2332.94,1171) 2439,1171 v2(2479,1131)
  Bottom Layer w5.91: v1(1212.6,1031.5) 1503.94,1031.5 1511.81,1039.37 2000,1039.37 2003.94,1043.31 2015.75,1043.31 2023.62,1051.18 2027.56,1051.18 2031.5,1055.12 2035.43,1055.12 2039.37,1059.06 2043.31,1059.06 2047.24,1062.99 2051.18,1062.99 2055.12,1066.93 2059.06,1066.93 2062.99,1070.87 2070.87,1070.87 2074.8,1074.8 2078.74,1074.8 2082.68,1078.74 2086.61,1078.74 2090.55,1082.68 2094.49,1082.68 2098.43,1086.61 2102.36,1086.61 2106.3,1090.55 2114.17,1090.55 2118.11,1094.49 2122.05,1094.49 2125.98,1098.43 2129.92,1098.43 2133.86,1102.36 2137.8,1102.36 2141.73,1106.3 2145.67,1106.3 2149.61,1110.24 2157.48,1110.24 2161.42,1114.17 2165.35,1114.17 2169.29,1118.11 2173.23,1118.11 2177.17,1122.05 2181.1,1122.05 2185.04,1125.98 2188.98,1125.98 2192.91,1129.92 2200.79,1129.92 2204.72,1133.86 2208.66,1133.86 2212.6,1137.8 2216.54,1137.8 2220.47,1141.73 2224.41,1141.73 v1(2251.97,1169.29)
OPT_TX: R10.1 TP7.1 U2.29 | length 1227.1
  Top Layer w5.91: v2(866.14,1721.97) 866.14,1720.47 v1(889.76,1696.85) ; v1(1397.64,1153.54) 1417.32,1133.86 1417.32,1129.92 1472.44,1074.8 1500,1074.8 1503.94,1070.87 U2.29
  Top Layer w10: R10.1 683.07,1739.07 700,1722.14 816.63,1722.14 TP7.1 v2(866.14,1721.97)
  Bottom Layer w5.91: v1(889.76,1696.85) 1259.84,1326.77 1259.84,1291.34 v1(1397.64,1153.54)
OSC_IN: C5.1 U2.5 Y1.1 | length 883.4
  Top Layer w5.91: v1(523.62,1003.94) v1@524.61,1002 ; v1(1122.05,1133.86) 1173.23,1133.86 U2.5
  Top Layer w10: Y1.1 482.28,1044.32 524.61,1002 C5.1
  Bottom Layer w5.91: v1(523.62,1003.94) 527.56,1003.94 531.5,1007.87 535.43,1007.87 539.37,1011.81 881.89,1011.81 1003.94,1133.86 v1(1122.05,1133.86)
OSC_OUT: C6.1 U2.6 Y1.2 | length 641
  Top Layer w5.91: Y1.2 858.27,1102.36 862.2,1098.43 866.14,1098.43 870.08,1094.49 874.02,1094.49 877.95,1090.55 881.89,1090.55 885.83,1086.61 889.76,1086.61 893.7,1082.68 897.64,1082.68 901.57,1078.74 905.51,1078.74 909.45,1074.8 913.39,1074.8 917.32,1070.87 921.26,1070.87 925.2,1066.93 929.13,1066.93 933.07,1062.99 937.01,1062.99 940.94,1059.06 944.88,1059.06 948.82,1055.12 952.76,1055.12 956.69,1051.18 960.63,1051.18 v1(968.5,1043.31) ; v1(1125.98,1066.93) 1129.92,1070.87 1129.92,1098.43 1141.73,1110.24 1173.23,1110.24 U2.6
  Top Layer w10: C6.1 760.83,1102.36 Y1.2
  Bottom Layer w5.91: v1(968.5,1043.31) 992.13,1066.93 v1(1125.98,1066.93)
POWER_A: D4.2 R8.2 | length 225.6
  Top Layer w10: D4.2 413.78,600 453.78,600 498.03,644.25 R8.2
RX_AC: C18.2 R15.1 U3.5 | length 651.5
  Top Layer w10: C18.2 2310.04,1482.65 2336,1456.69 R15.1 v2(2376,1408) ; U3.5 2685.72,1657.28 v2(2686,1657)
  Bottom Layer w10: v2(2376,1408) 2625,1657 v2(2686,1657)
RX_FILTER: C19.1 R17.1 R18.1 R21.1 TP6.1 U3.7 | length 1958.1
  Top Layer w10: v2(2100.39,1210) R21.1 ; U3.7 v2(2694,1757.28) ; R18.1 2730.31,1360 ; R17.1 2730.31,1557.69 2735,1553 2735,1457.69 2730.31,1453 2730.31,1360 ; v2(2761,1442) 2775.69,1456.69 2827.01,1456.69 ; v2(2841,1610.28) 2874.02,1577.27 2874.02,1529 ; C19.1 2886.81,1541.8 2874.02,1529 ; 2730.31,1360 2827.01,1456.69 ; 2827.01,1456.69 TP6.1 2874.02,1529
  L2_GND w10: v2(2100.39,1210) 2150.39,1260 2720,1260 2761,1301 v2(2761,1442)
  L3_POWER w10: v2(2694,1757.28) v2(2841,1610.28)
RX_MONITOR: C20.1 R21.2 U2.11 | length 1269.3
  Top Layer w5.91: U2.11 1173.23,1015.75 1192.91,1015.75 1196.85,1011.81 1200.79,1011.81 1200.79,1007.87 1224.41,1007.87 v1(1271.65,1055.12) ; v1(1980.32,1196.85) v1@1981.3,1195.7
  Top Layer w10: C20.1 v1@1981.3,1196.14 ; v2@2008,1169 1981.3,1195.7 v1@1981.3,1196.14 ; v2(2008,1169.44) v1@1981.3,1196.14 ; v2(2151.57,1169) R21.2
  L2_GND w10: v2@2008,1169 v2(2151.57,1169)
  Bottom Layer w5.91: v1(1271.65,1055.12) 1330.71,1055.12 1437.01,1161.42 1614.17,1161.42 1618.11,1165.35 1625.98,1165.35 1629.92,1169.29 1937.01,1169.29 1952.76,1185.04 1956.69,1185.04 1960.63,1188.98 1964.57,1188.98 1968.5,1192.91 1972.44,1192.91 1976.38,1196.85 v1(1980.32,1196.85)
STATUS: D3.1 U2.2 | length 1024.3
  Top Layer w5.91: D3.1 287.4,866.14 v1(322.83,901.57) ; v1(1125.98,1188.98) 1173.23,1188.98 U2.2
  Bottom Layer w5.91: v1(322.83,901.57) 326.77,901.57 409.45,984.25 468.5,984.25 511.81,1027.56 645.67,1027.56 649.61,1031.5 653.54,1031.5 657.48,1035.43 661.42,1035.43 665.35,1039.37 669.29,1039.37 673.23,1043.31 677.17,1043.31 681.1,1047.24 688.98,1047.24 692.91,1051.18 889.76,1051.18 1027.56,1188.98 v1(1125.98,1188.98)
STATUS_A: D3.2 R7.2 | length 303.4
  Top Layer w10: D3.2 393,817.63 v2(393,777) ; v2(498.03,777) R7.2
  L2_GND w10: v2(393,777) v2(498.03,777)
SWCLK: J2.4 U2.37 | length 1441
  Top Layer w5.91: U2.37@1446.85,1269.68 1448.82,1267.72 1448.82,1244.09 1405.51,1200.79 1377.95,1200.79 1358.27,1181.1 1350.39,1181.1 1338.58,1169.29 1338.58,1129.92 v1(1460.63,1007.87) ; J2.4 1476.38,236.22 1480.32,232.28 1484.25,232.28 1488.19,228.35 1492.13,228.35 1539.37,181.1 1618.11,181.1 1622.05,185.04 1622.05,287.4 1614.17,295.28 v1(1614.17,696.85)
  Bottom Layer w5.91: v1(1460.63,1007.87) 1460.63,858.27 1492.13,826.77 1492.13,818.9 v1(1614.17,696.85)
SWDIO: J2.2 U2.34 | length 1263.6
  Top Layer w5.91: J2.2 1279.53,236.22 v1(1279.53,299.21) ; v1(1362.2,1157.48) 1366.14,1157.48 1385.83,1177.17 1409.45,1177.17 1421.26,1165.35 1472.44,1165.35 1476.38,1169.29 1500,1169.29 1503.94,1173.23 U2.34
  Bottom Layer w5.91: v1(1279.53,299.21) 1224.41,354.33 1224.41,358.27 1220.47,362.2 1220.47,370.08 1216.54,374.02 1216.54,377.95 1212.6,381.89 1212.6,385.83 1208.66,389.76 1208.66,393.7 1204.72,397.64 1204.72,401.57 1200.79,405.51 1200.79,413.39 1196.85,417.32 1196.85,421.26 1192.91,425.2 1192.91,429.13 1188.98,433.07 1188.98,437.01 1185.04,440.94 1185.04,444.88 1181.1,448.82 1181.1,456.69 1177.17,460.63 1177.17,464.57 1173.23,468.5 1173.23,980.32 1188.98,996.06 1188.98,1082.68 1200.79,1094.49 1299.21,1094.49 v1(1362.2,1157.48)
TIA_OUT: C16.1 C18.1 R14.1 TP5.1 U3.1 | length 539.5
  Top Layer w10: C18.1 2256.89,1640.75 TP5.1 2244.09,1732.28 C16.1 2296.26,1769 2297.24,1769.98 R14.1 2297.24,1830 2308.24,1841 2381,1841 2381,1807.28 U3.1
TIA_SUM: C16.2 D6.2 R14.2 U3.2 | length 616.2
  Top Layer w10: R14.2 2348.43,1769.98 2349.41,1769 C16.2 2368,1732.28 2393,1757.28 U3.2 2446.28,1757.28 2459,1770 2459,1847.19 D6.2
TX_GATE: Q1.1 R10.2 R11.1 | length 327.7
  Top Layer w10: Q1.1 576,1848.43 617.34,1889.76 R11.1 683.07,1856.18 734.25,1805 R10.2
UART_RX: D2.2 J3.3 R6.1 | length 786.7
  Top Layer w10: v2(1725.11,377) 1743.78,395.67 D2.2 ; R6.1 1824.8,570 1839.8,585 1925,585 1989.76,520.24 J3.3
  L2_GND w10: v2(1725.11,377) 1930,377 1958,349 1989.76,349 J3.3
UART_TX: D2.1 J3.2 R5.2 | length 371.8
  Top Layer w10: R5.2 1740.47,551.18 1771.65,520 D2.1 1860,470.47 1889.76,440.71 J3.2
V3V3: C2.1 C8.1 C9.1 C10.1 C11.1 C12.1 J2.1 R1.1 R2.1 R7.1 R8.1 TP3.1 U1.5 U2.1 U2.24 U2.36 U2.48 | length 6536.7
  Top Layer w5.91: v3(1161.42,1236.22) 1173.23,1224.41 1173.23,1212.6 U2.1 ; v3(1204.72,1267.72) 1228.35,1267.72 U2.48 ; C8.1@1271.65,1338.58 C8.1 ; C10.1 1311.02,826.77 1311.52,826.28 1314.96,822.83 1314.96,818.9 1318.9,814.96 1318.9,811.02 1322.83,807.09 1322.83,803.15 v3(1338.58,787.4) v3(1338.58,763.78) ; v3(1401.57,795.28) 1389.76,795.28 1393.7,799.21 1393.7,807.09 1421.26,834.65 1421.26,881.89 1444.88,905.51 1444.88,933.07 U2.24@1448.82,937.01 ; v3(1472.44,1232.28) 1484.25,1232.28 ; U2.36 1503.94,1212.6 1492.13,1224.41 ; v3(1511.81,1291.34) v3(1511.81,1267.72) 1519.68,1267.72 1523.62,1271.65 1527.56,1271.65 1531.5,1275.59 1535.43,1275.59 1539.37,1279.53 v4(1540,1279.68) ; v3(1547.24,1212.6) 1539.37,1212.6 1531.5,1220.47 1500,1220.47 1496.06,1224.41 1492.13,1224.41 ; 1484.25,1232.28 1492.13,1224.41 ; 1484.25,1232.28 1492.13,1224.41
  Top Layer w10: R8.1 446.85,690.85 ; R7.1 446.85,852.44 453,852.44 453,743.78 446.85,737.63 446.85,690.85 ; v4(919.29,1280) R2.1 859,1377.95 667,1185.95 667,760 611,704 460,704 446.85,690.85 ; C11.1 1036.42,1002.58 1220.47,818.53 1220.47,781.24 ; U1.5 1188.98,431.1 ; J2.1 1177.95,309 1188.98,320.02 C2.1 1188.98,431.1 ; C8.1 1272.64,1360 1290.59,1377.95 C12.1 ; C10.1 1266,826.77 1220.47,781.24 ; v4(1540,1279.68) 1503.94,1315.74 1503.94,1316.06 ; v4@1540,1280 1503.94,1316.06 ; v4(1626.97,910.97) C9.1 1631.25,979.35 v4(1638,972.59) ; R1.1 1561.74,1574.8 1503.94,1517 C12.1 ; 1188.98,431.1 1188.98,559.06 TP3.1 1220.47,781.24 ; 1503.94,1316.06 C12.1
  L3_POWER w5.91: v3(1338.58,763.78) 1354.33,779.53 1358.27,779.53 1362.2,783.46 1366.14,783.46 1370.08,787.4 1393.7,787.4 v3(1401.57,795.28) ; v3(1511.81,1291.34) 1519.68,1283.46 1519.68,1280 1519.68,1255.91 1547.24,1228.35 v3(1547.24,1212.6)
  L3_POWER w10: J2.1 1177.95,461.95 v4(1626.97,910.97) ; v4@1540,1280 1519.68,1280 v4(919.29,1280) 965.26,1234.03 1368,1234.03 v4@1626.97,975.06
V3V3_A: C3.1 C4.1 C13.1 C17.1 C21.1 D6.1 R1.2 R12.1 U2.9 U3.8 U4.5 | length 4996.8
  Top Layer w5.91: v4(997.05,973) 996.06,972.44 996.84,973.21 997.05,973.43 1000,976.38 v3(1027.56,976.38) v3(1047.24,956.69) ; C13.1 996.06,1259.84 996.56,1260.33 1019.68,1283.46 1019.68,1287.4 v3(1039.37,1307.09) ; v3(1114.17,1015.75) 1118.11,1019.68 1118.11,1023.62 1122.05,1027.56 1122.05,1031.5 v3(1125.98,1035.43) 1133.86,1043.31 1137.8,1043.31 1137.8,1047.24 1141.73,1047.24 1141.73,1051.18 1153.54,1051.18 1157.48,1055.12 1173.23,1055.12 U2.9@1171.26,1053.15 ; v3(1838.58,1535.43) 1870.08,1566.93 1870.08,1570.87 1874.02,1574.8 R1.2
  Top Layer w10: v4(997.05,973) 997.05,973.43 C13.1 ; R1.2 C3.1 1976.38,1650 2021.65,1695.28 R12.1 2000,1771.65 1989,1782.65 1989,1966 2109.61,2086.61 D6.1 2579.81,2168 2757.91,2168 2768.86,2157.05 2768.86,2018.27 2670.59,1920 2670.59,1850.39 C17.1 2650.59,1831.89 U3.8 2581.18,1807.28 2533.9,1760 2533.9,1392.1 2613,1313 2613,1257.87 U4.5 2577,1222.67 2577,1159 2611.22,1124.78 C21.1 ; C4.1 2159,1574.8 2159,1538 v4(2184,1513)
  L3_POWER w5.91: v3(1039.37,1307.09) 1094.49,1307.09 1248.03,1460.63 1751.97,1460.63 1826.77,1535.43 v3(1838.58,1535.43) ; v3(1047.24,956.69) 1090.55,1000 1094.49,1000 1110.24,1015.75 v3(1114.17,1015.75)
  L3_POWER w10: v4(2184,1513) 2498.43,1827.43 D6.1
V5_PROTECTED: C1.1 C14.1 D1.1 R9.1 TP2.1 U1.1 U1.3 | length 3487.2
  Top Layer w10: R9.1 299.21,1837.75 283.46,1822 C14.1 283.46,1409.45 TP2.1 179,1241.99 179,235 240,174 600,174 663,237 663,393.7 D1.1@708,393.7 ; D1.1 D1.1@708,393.7 ; C1.1 874.02,488.98 920,443 930.36,443 930.36,349.36 920,339 729,339 708,360 ; U1.3 U1.3@1012,356.3 ; U1.1 1035.9,431.1 1047,420 1047,370 1033.3,356.3 U1.3@1012,356.3 ; 708,360 D1.1@708,393.7 ; 708,360 708,355 740,323 1000,323 1012,335 U1.3@1012,356.3
VIN_5V: F1.1 J1.1 | length 284.5
  Top Layer w10: J1.1 285.29,334 400.93,334 F1.1
VREF: C15.1 R12.2 R13.1 R15.2 R16.2 TP4.1 U3.3 U4.4 | length 2975.6
  Top Layer w7.87: v4(2427.17,1368) 2429.13,1366.14 v3(2444.88,1350.39) ; v3(2507.87,1574.8) 2511.81,1570.87 2511.81,1566.93 v3@2513.9,1564.84 ; v3(2610.24,1212.6) 2610.24,1181.1 U4.4 ; v3(2649.61,1586.61) 2677.17,1586.61 v4(2677,1585) ; v3@2513.9,1564.84 2515.75,1562.99 v3@2513.9,1564.83
  Top Layer w10: R12.2 2072.83,1805 2021.65,1856.18 R13.1 2021.65,1910 2039.65,1928 2173.23,1928 ; C15.1 2173.23,1928 ; U3.3 2445,1707.28 2455.72,1718 ; v4(2427.17,1368) R15.2 2427.17,1478.1 2513.9,1564.83 2513.9,1704.1 2500,1718 2455.72,1718 ; U4.4 2803,1183.07 2841.93,1222 v4(2859,1222) ; v4(2677,1585) 2702.76,1559.24 R16.2 ; 2173.23,1928 2173.23,1944 2165.35,1951.87 TP4.1 2539.87,2007.87 2630,2098 2630,2127.05 2640,2137.05 2748.86,2137.05 2748.86,2036.18 2650.59,1937.91 2650.59,1912.87 2455.72,1718
  L3_POWER w7.87: v3(2444.88,1350.39) 2464.57,1350.39 2468.5,1346.46 2476.38,1346.46 2480.32,1342.52 2484.25,1342.52 2488.19,1338.58 2492.13,1338.58 2496.06,1334.65 2500,1334.65 2503.94,1330.71 2507.87,1330.71 2511.81,1326.77 2531.5,1326.77 2590.55,1267.72 2590.55,1232.28 v3(2610.24,1212.6) ; v3(2507.87,1574.8) 2543.31,1574.8 2547.24,1578.74 2551.18,1578.74 2555.12,1582.68 2562.99,1582.68 2566.93,1586.61 v3(2649.61,1586.61)
pads on no net: U1.4 U2.3 U2.4 U2.14 U2.15 U2.16 U2.17 U2.18 U2.19 U2.21 U2.22 U2.25 U2.26 U2.27 U2.28 U2.30 U2.31 U2.32 U2.33 U2.38 U2.39 U2.40 U2.41 U2.42 U2.43 U2.45 U2.46

## Polygon pours and split planes (outlines as drawn)
GND on L2_GND "L2_GND-GND" (solid, remove dead copper, pour order 0): 19.68,19.68 3129.92,19.68 3129.92,2342.52 19.68,2342.52

## Silkscreen, mask and mechanical layers (free items; w line width, h text height)
Top Overlay:
  text "Li-Fi FULL DUPLEX" at 1109.45,2220.47 h47.24
  text "D5 TX LED" at 432.32,2165.35 h29.53
  text "D6 BPW34 RX" at 2454.49,2165.35 h29.53
  text "4 Layer" at 1380,2115 h33.46
  text "TP4 VREF" at 2059.06,2070.87 h29.53
  text "R9 150R" at 260.59,1992.13 h29.53
  text "2A" at 508.86,1984.25 h27.56
  text "1K" at 2469.09,1984.25 h27.56
  text "2A" at 2669.09,1984.25 h27.56
  text "C15 10uF" at 2224.41,1968.5 h29.53
  text "R11 100k" at 602.36,1952.76 h29.53
  text "R13 10k" at 1922.01,1952.76 h29.53
  text "1K" at 471.85,1937.01 h27.56
  text "R14 100k" at 2295.28,1917.32 h29.53
  text "C17 100nF" at 2558.31,1913.39 h29.53
  text "U3 OPA2320" at 2325.28,1858.27 h29.53
  text "TP7 OPT TX" at 782.01,1834.65 h29.53
  text "C14 10uF" at 208.66,1795.28 h29.53
  text "1" at 2214.65,1791.54 h27.56
  text "TP5 TIA" at 1780.28,1755.91 h29.53
  text "TP6 RX FILTER" at 2704.96,1740.16 h29.53
  text "1" at 423.31,1738.19 h27.56
  text "R10 100R" at 722.6,1692.91 h29.53
  text "R12 10k" at 1953.5,1692.91 h29.53
  text "Q1 AO3400A" at 419.76,1685.04 h29.53
  text "R17 20k" at 2693.66,1677.17 h29.53
  text "R1 10R" at 1769.21,1637.8 h29.53
  text "C3 10uF" at 1961.38,1637.8 h29.53
  text "C16 22pF" at 2358.27,1574.8 h29.53
  text "C19 100pF" at 2794.53,1535.43 h29.53
  text "R15 100k" at 2358.27,1519.68 h29.53
  text "C8 100nF" at 1240.16,1511.81 h29.53
  text "C7 100nF" at 996.06,1503.94 h29.53
  text "C12 4.7uF" at 1479.57,1503.94 h29.53
  text "C4 100nF" at 1996.06,1480.32 h29.53
  text "U2 STM32F103C8T6" at 1131.89,1448.82 h29.53
  text "TP2 5V" at 233.78,1440.94 h29.53
  text "R2 10k" at 863.7,1440.94 h29.53
  text "C18 10nF" at 2114.17,1425.2 h29.53
  text "R16 1k" at 2595.98,1417.32 h29.53
  text "1" at 2448.94,1352.36 h27.56
  text "R21 10k" at 2032.24,1322.83 h29.53
  text "U4 TLV3201" at 2411.89,1299.21 h29.53
  text "TP1 GND" at 221.22,1283.46 h29.53
  text "R3 10k" at 1572.36,1283.46 h29.53
  text "R18 10k" at 2803.9,1259.84 h29.53
  text "Y1 8MHz" at 575.55,1181.1 h29.53
  text "C13 100nF" at 873.27,1181.1 h29.53
  text "C20 1nF" at 1914.13,1181.1 h29.53
  text "R20 100R" at 2232.28,1141.73 h29.53
  text "R19 2.2M" at 2720.47,1141.73 h29.53
  text "1" at 1082.76,1131.89 h27.56
  text "C9 100nF" at 1562.99,1125.98 h29.53
  text "TP8 OPT RX" at 2152.09,1078.74 h29.53
  text "C21 100nF" at 2518.94,1023.62 h29.53
  text "C11 100nF" at 865.39,984.25 h29.53
  text "D3 STATUS" at 196.1,929.13 h29.53
  text "1" at 196.97,881.89 h27.56
  text "C5 30pF" at 551.93,866.14 h29.53
  text "C6 30pF" at 772.4,866.14 h29.53
  text "R4 10k" at 1414.88,811.02 h29.53
  text "R7 1k" at 403.78,787.4 h29.53
  text "C10 100nF" at 1172.48,748.03 h29.53
  text "R8 2.2k" at 449.57,732.28 h29.53
  text "D4 POWER" at 177.17,716.54 h29.53
  text "1" at 196.97,669.29 h27.56
  text "TP3 3V3" at 1126.73,653.54 h29.53
  text "C1 4.7uF" at 799.21,614.17 h29.53
  text "R5 100R" at 1599.17,614.17 h29.53
  text "R6 100R" at 1819.65,614.17 h29.53
  text "U1 AP2112 3V3" at 1004.17,488.19 h29.53
  text "J1 5V IN" at 169.29,472.44 h29.53
  text "F1 250mA" at 405.51,472.44 h29.53
  text "1" at 923.31,462.6 h27.56
  text "D1 SS14" at 693.66,456.69 h29.53
  text "D2 ESD" at 1556.61,448.82 h29.53
  text "C2 4.7uF" at 1318.9,409.45 h29.53
  text "1" at 1683.19,391.73 h27.56
  text "J2 SWD" at 1312.48,314.96 h29.53
  text "1" at 651.65,299.21 h27.56
  text "1" at 207.99,291.34 h27.56
  text "2" at 307.95,291.34 h27.56
  text "J3: 1=GND 2=TX 3=RX" at 2173.11,251.97 h27.56
  text "1" at 1740.67,212.6 h27.56
  text "3" at 2003.62,212.6 h27.56
  text "J3 UART" at 1786.02,204.72 h29.53
  text "2" at 1872.17,149.61 h27.56
  text "J1: 1=5V  2=GND" at 435.79,133.86 h29.53
  text "1" at 1160.35,133.86 h27.56
  text "2" at 1260.35,133.86 h27.56
  text "3" at 1360.35,133.86 h27.56
  text "4" at 1460.35,133.86 h27.56
  text "5" at 1560.35,133.86 h27.56
  text "J2: 1=3V3 2=IO 3=GND 4=CLK 5=RST" at 1220.87,78.74 h25.59